# EAGLE board PCB Layout (EAGLE 9.7.0)
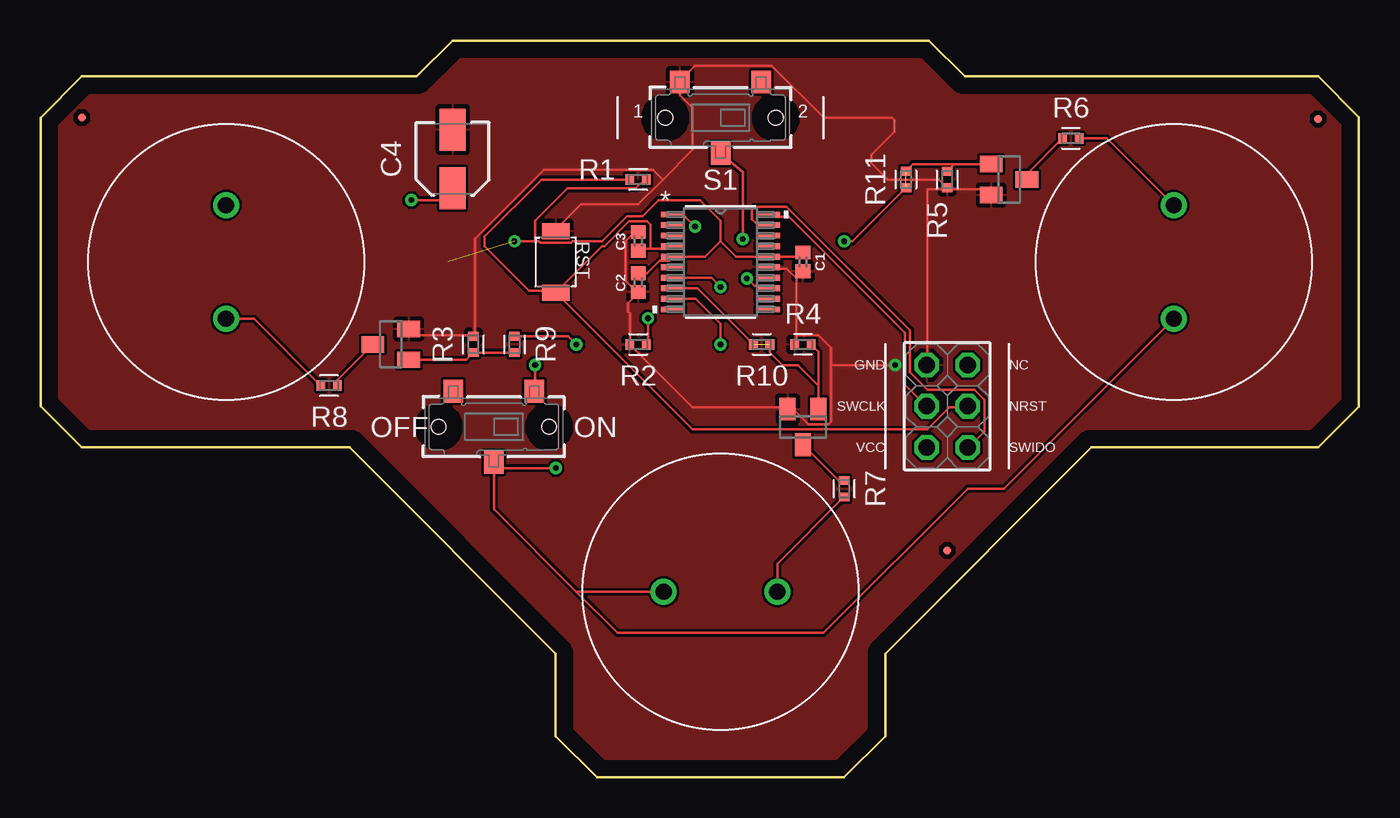
[diagram p0: board, top side]
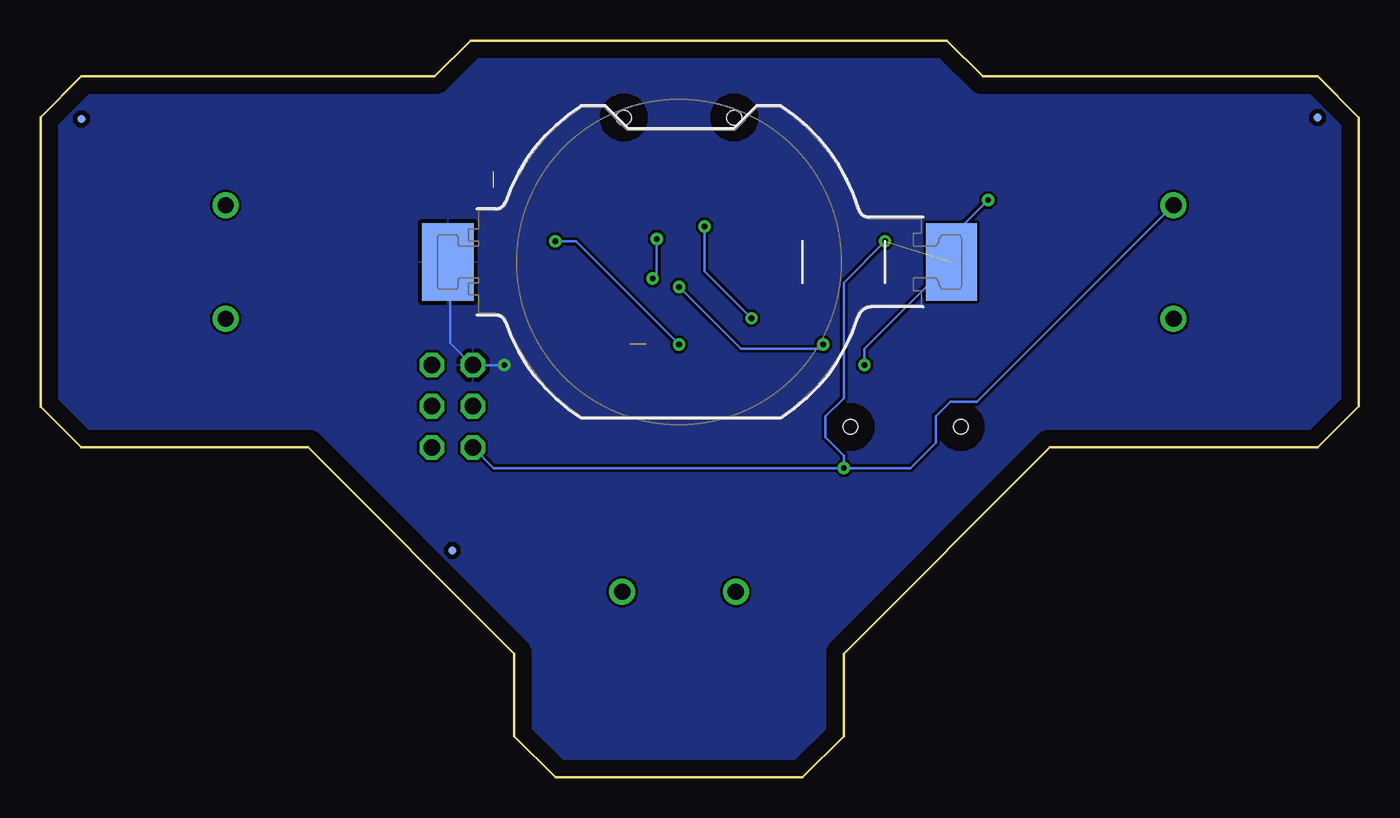
[diagram p1: board, bottom side, seen from below]

Size 81.26 x 45.39 mm. Coordinates in mm from the lower left corner, seen from the top.
Outline: 0,40.64 0,22.86 2.54,20.32 19.05,20.32 31.75,7.62 31.75,2.54 34.29,0 49.53,0 52.07,2.54 52.07,7.62 64.77,20.32 78.74,20.32 81.26,22.84 81.26,40.66 78.74,43.18 56.96,43.18 54.75,45.39 25.4,45.39 23.19,43.18 2.54,43.18 0,40.64
Copper layers (1*16): Top / Bottom
Stack-up Default Layer Stack: Top SilkScreen Epoxy Ink / Top SolderMask SR:Green 0.0254mm Dk 4.3 / Top Surface Finish Lead-Free 0.02mm / Top CuFoil:007 0.035mm / Dielectric-1 User Defined 1.5mm / Bottom CuFoil:007 0.035mm / Bottom Surface Finish Lead-Free 0.02mm / Bottom SolderMask SR:Green 0.0254mm Dk 4.3 / Bottom SilkScreen Epoxy Ink
Design rules: minimum drill size 0.35mm, minimum copper width 6mil, keepout clearance 0mil, drill distance 6mil, via restrict clearance 0mil, dimension clearance 40mil, restrict clearance 0mil, copper clearance wire_polygon to wire_polygon 6mil, copper clearance wire_polygon to pad_smd 6mil, copper clearance wire_polygon to via 6mil, copper clearance pad_smd to pad_smd 6mil, copper clearance pad_smd to via 6mil, copper clearance via to via 6mil, copper clearance smd to pad (same net) 6mil, copper clearance smd to via (same net) 6mil, copper clearance smd to smd (same net) 6mil

## Footprints (pad centres in the part's own frame; a part is rotated, then mirrored left to right if it is on the bottom)
796136-1 = smd 3.15 x 4.78: N 14.25,0; P -16.79,0
0402 = smd 0.85 x 0.9: 1 -0.58,0; 2 0.58,0
CAPAE430X430N = smd 2.6 x 1.6: 1 -1.8,0; 2 1.8,0
FID_020 = smd 0.508 x 0.508 bottom: FIDB 0,0 | smd 0.508 x 0.508: FIDT 0,0
2X03 = drill 1.016 octagon: 1 -2.54,1.27; 2 0,1.27; 3 2.54,1.27; 4 -2.54,-1.27; 5 0,-1.27; 6 2.54,-1.27
PIEZO = drill 1 pad 1.6: 1 -3.5,0; 2 3.5,0
SOT23 = smd 1 x 1.4: 1 -0.95,-1.1; 2 0.95,-1.1; 3 0,1.1
RESC1005X40 = smd 0.535 x 0.644: 1 -0.507,0; 2 0.507,0
CL-SB-12B-01T = smd 1.2 x 1.4: 1 -2.5,-2.2; 3 2.5,-2.2; C 0,2.2 | hole 0.9: -3.4,0; 3.4,0
SW2-2.6-3.0X2.5X1.2+0.4MM = smd 1 x 1.7: 1 -1.9,0; 2 1.9,0
TSSOP20 = smd 1.473 x 0.356: 1 -2.921,2.925; 2 -2.921,2.275; 3 -2.921,1.625; 4 -2.921,0.975; 5 -2.921,0.325; 6 -2.921,-0.325; 7 -2.921,-0.975; 8 -2.921,-1.625; 9 -2.921,-2.275; 10 -2.921,-2.925; 11 2.921,-2.925; 12 2.921,-2.275; 13 2.921,-1.625; 14 2.921,-0.975; 15 2.921,-0.325; 16 2.921,0.325; 17 2.921,0.975; 18 2.921,1.625; 19 2.921,2.275; 20 2.921,2.925

## Placement (x,y rotation side)
BT1  796136-  [796136-1]  41.91,31.75 180 bottom
C1  0.1uF  [0402]  46.99,31.75 270 top
C2  0.1uF  [0402]  36.83,30.48 270 top
C3  0.1uF  [0402]  36.83,33.02 90 top
C4  47uF  [CAPAE430X430N]  25.4,38.1 90 top
FD1  FID_20MIL  [FID_020]  2.54,40.64 0 top
FD2  FID_20MIL  [FID_020]  78.74,40.56 0 top
FD3  FID_20MIL  [FID_020]  55.88,13.97 0 top
JP1  PINHD-2X3  [2X03]  55.88,22.86 90 top
LS1  PIEZO  [PIEZO]  11.43,31.75 90 top
LS2  PIEZO  [PIEZO]  41.91,11.43 180 top
LS3  PIEZO  [PIEZO]  69.85,31.75 270 top
Q1  NMOSFET  [SOT23]  21.59,26.67 90 top
Q2  NMOSFET  [SOT23]  46.99,21.59 180 top
Q3  NMOSFET  [SOT23]  59.69,36.83 270 top
R1  10k  [RESC1005X40]  36.83,36.83 0 top
R2  10k  [RESC1005X40]  36.83,26.67 180 top
R3  100k  [RESC1005X40]  26.67,26.67 270 top
R4  100k  [RESC1005X40]  46.99,26.67 0 top
R5  100k  [RESC1005X40]  55.88,36.83 90 top
R6  150  [RESC1005X40]  63.5,39.37 180 top
R7  150  [RESC1005X40]  49.53,17.78 270 top
R8  150  [RESC1005X40]  17.78,24.13 0 top
R9  220  [RESC1005X40]  29.21,26.67 90 top
R10  220  [RESC1005X40]  44.45,26.67 180 top
R11  220  [RESC1005X40]  53.34,36.83 90 top
S1  SPDT_SWITCH_CL-SB-12B-01T  [CL-SB-12B-01T]  41.91,40.64 180 top
S2  SPDT_SWITCH_CL-SB-12B-01T  [CL-SB-12B-01T]  27.94,21.59 180 top
SW1  B3U-1000P-2P-SMD  [SW2-2.6-3.0X2.5X1.2+0.4MM]  31.75,31.75 270 top
U1  STM32L031F6P6TSSOP20  [TSSOP20]  41.91,31.75 0 top

## Library data of the parts
BT1 = Battery_Holder
C1-C3 = SparkFun-RF; PROD_ID: CAP-12416
C4 = Capacitor; CATEGORY_L1: Capacitor; CATEGORY_L2: Aluminum Electrolytic Capacitors; CATEGORY_L3: Radial can; DESCRIPTION: ECAP (Aluminum Electrolytic Capacitor), 0.157" Dia (4.00mm) body Size, 0.217" (5.50mm) Height - Seated (Max), 0.169" L x 0.169" W (4.30mm x 4.30mm) Surface Mount Land Size; PACKAGE: Surface Mount
FD1-FD3 = PCB_Utilities; CATEGORY_L1: Fiducial Marks; DESCRIPTION: Fiducial Mark 0.508mm (20mil); PACKAGE: Surface Mount
JP1 = Connector
LS1-LS3 = Tinkercad
Q1-Q3 = Tinkercad; CATEGORY: Transistor; SUB-CATEGORY: MOSFET; TYPE: N-Channel
R1-R11 = Resistor
S1 S2 = Switch
SW1 = Fidget_Spinner; MPN: B3U-1000P-2P-SMD
U1 = 2026-06-21_14-31-46_Library; COPYRIGHT: Copyright (C) 2026 Ultra Librarian. All rights reserved.; DATASHEET: https://www.st.com/resource/en/datasheet/stm32l031g4.pdf; DESCRIPTION: Ultra-low-power Arm Cortex-M0+ MCU with 32-Kbytes of Flash memory, 32 MHz CPU; MANUFACTURER_NAME: STMicroelectronics; MANUFACTURER_PART_NUMBER: STM32L031F6P6

## Nets
+: BT1.P C1.1 C2.1 C4.1 JP1.1 LS1.2 LS2.2 LS3.2 R1.2 S2.1 S2.C U1.5 U1.16
BUZZER1_OUT: R9.2 U1.7
BUZZER2_OUT: Q2.1 R4.2 R10.1 R10.2 U1.8
BUZZER3_OUT: Q3.1 R5.2 R11.1 R11.2 U1.9
GND: BT1.N C1.2 C2.2 C3.2 C4.2 JP1.3 Q1.2 Q2.2 Q3.2 R2.2 R3.1 R4.1 R5.1 S1.3 SW1.1 U1.15
N$1: R2.1 U1.1
N$2: Q1.3 R8.2
N$3: Q2.3 R7.1
N$4: Q3.3 R6.2
N$5: S1.C U1.13
N$6: LS3.1 R6.1
N$7: LS2.1 R7.2
N$8: LS1.1 R8.1
N$9: Q1.1 R3.2 R9.1
NRST: C3.1 JP1.5 R1.1 SW1.2 U1.4
SWCLK: JP1.2 U1.20
SWDIO: JP1.4 U1.19

## Tracks (layer width: path | path; a pad name or v marks a point on that pad's centre or on a via)
+  (via drill 0.35)  (1 unrouted)
  Top 0.152: v22.86,35.56 25.4,35.56 C4.1 | v30.48,25.4 30.48,23.83 S2.1 | v31.75,19.05 28.28,19.05 S2.C 27.94,16.51 33.02,11.43 | 33.02,11.43 LS2.2 | 33.02,11.43 35.56,8.89 48.26,8.89 57.15,17.78 59.38,17.78 LS3.2 | v29.21,33.02 30.48,33.02 | 30.48,33.02 30.48,34.29 32.47,36.28 36.69,36.28 37.23,36.83 R1.2 | 30.48,33.02 30.71,33.02 30.8,32.92 32.7,32.92 32.79,33.02 34.62,33.02 36.16,34.56 37.1,34.56 38.1,35.56 40.64,35.56 41.91,34.29 41.91,33.02 | 41.91,33.02 40.96,32.08 U1.5 38.74,31.83 38.16,31.83 37.39,31.06 C2.1 | 41.91,33.02 42.85,32.08 U1.16 46.73,32.08 C1.1
  Bottom 0.152: v22.86,35.56 25.12,33.3 BT1.P 30.48,26.39 v30.48,25.4 | v31.75,19.05 53.34,19.05 JP1.1 | v31.75,19.05 27.63,19.05 26.08,20.6 26.08,22.23 25.18,23.13 23.55,23.13 LS1.2 | v29.21,33.02 31.75,30.48 31.75,23.36 32.88,22.23 32.88,20.95 31.75,19.82 v31.75,19.05
BUZZER1_OUT  (via drill 0.35)
  Top 0.152: R9.2 32.51,27.18 v33.02,26.67 | U1.7 41.35,30.77 v41.91,30.21
  Bottom 0.152: v33.02,26.67 33.29,26.4 38.1,26.4 v41.91,30.21
BUZZER2_OUT  (1 unrouted)
  Top 0.152: Q2.1 47.94,24.13 | 47.94,24.13 47.94,26.23 R4.2 | 47.94,24.13 46.67,25.4 45.72,25.4 44.96,26.16 R10.1 | R10.2 40.49,30.12 U1.8
BUZZER3_OUT  (via drill 0.35)  (1 unrouted)
  Top 0.152: U1.9 40.38,29.47 41.91,27.94 v41.91,26.67 | Q3.1 56.32,37.78 | 56.32,37.78 53.78,37.78 R11.2 | R11.1 50.04,33.02 v49.53,33.02 | R5.2 56.32,37.78
  Bottom 0.152: v41.91,26.67 48.26,33.02 v49.53,33.02
GND  (via drill 0.35)
  Top 0.152: 36.83,29.82 36.07,30.58 36.07,33.02 36.52,33.48 36.83,33.48 C3.2 | 36.83,29.82 C2.2 | 46.58,30.73 46.58,27.23 | 46.58,27.23 46.58,26.77 R4.1 | 46.58,30.73 46.89,31.04 C1.2 | 48.72,25.4 48.72,26.47 47.95,27.23 46.58,27.23 | 48.72,25.4 48.72,21.89 48.56,21.74 47.35,21.74 46.43,22.66 46.13,22.66 Q2.2 45.97,22.81 40.18,22.81 36.37,26.62 R2.2 36.32,28.59 36.22,28.69 36.22,29.21 36.83,29.82 | 46.58,30.73 45.97,31.34 44.91,31.34 U1.15 | 55.98,36.22 54.66,36.22 54.66,25.4 JP1.3 | 55.98,36.22 58.17,36.22 58.47,35.92 Q3.2 | 55.98,36.22 R5.1 55.38,36.82 52.23,36.82 51.22,37.83 51.22,38.37 52.62,39.77 52.62,40.5 52.49,40.63 48.27,40.63 45.06,43.84 40.34,43.84 39.42,42.93 S1.3 39.42,42.77 39.42,42.01 40.18,41.25 40.18,38.66 38.35,36.83 | Q1.2 22.81,27.53 23.11,27.23 26.62,27.23 R3.1 26.77,27.23 26.77,33.17 31.04,37.44 37.74,37.44 38.35,36.83 | 38.35,36.83 36.83,35.31 33.33,35.31 31.8,33.78 SW1.1 | v52.68,25.4 48.72,25.4
  Bottom 0.152: BT1.N 56.03,31.65 56.03,26.77 54.66,25.4 JP1.3 v52.68,25.4
  pour Bottom: 0,40.64 0,22.86 2.54,20.32 19.05,20.32 31.75,7.62 31.75,2.54 34.29,0 49.53,0 52.07,2.54 52.07,7.62 64.77,20.32 78.74,20.32 81.26,22.84 81.26,40.66 78.74,43.18 56.96,43.18 54.75,45.39 25.4,45.39 23.19,43.18 2.54,43.18
  pour Top: 0,40.64 0,22.86 2.54,20.32 19.05,20.32 31.75,7.62 31.75,2.54 34.29,0 49.53,0 52.07,2.54 52.07,7.62 64.77,20.32 78.74,20.32 81.26,22.84 81.26,40.66 78.74,43.18 56.96,43.18 54.75,45.39 25.4,45.39 23.19,43.18 2.54,43.18
N$1  (via drill 0.35)
  Top 0.152: v40.34,33.93 39.73,34.54 39.12,34.54 U1.1 | R2.1 37.44,26.77 v37.44,28.28
  Bottom 0.152: v40.34,33.93 40.34,31.19 37.44,28.3 v37.44,28.28
N$2
  Top 0.152: Q1.3 18.29,24.47 R8.2
N$3
  Top 0.152: Q2.3 49.19,18.29 R7.1
N$4
  Top 0.152: Q3.3 60.79,37.17 R6.2
N$5  (via drill 0.35)
  Top 0.152: v43.28,33.17 43.28,37.28 S1.C | v43.54,30.73 43.99,30.28 44.76,30.28 U1.13
  Bottom 0.152: v43.28,33.17 43.28,30.99 v43.54,30.73
N$6
  Top 0.152: R6.1 65.73,39.37 LS3.1
N$7
  Top 0.152: R7.2 45.41,13.15 LS2.1
N$8
  Top 0.152: R8.1 13.15,28.25 LS1.1
N$9
  Top 0.152: Q1.1 26.23,25.72 R3.2 R9.1
NRST
  Top 0.152: 37.59,32.56 38.81,32.56 38.96,32.72 U1.4 | 37.59,32.56 36.83,32.56 C3.1 | R1.1 30.89,36.83 27.38,33.33 27.38,32.72 30.12,29.97 31.65,29.97 SW1.2 | JP1.5 57.1,22.81 56.03,22.81 54.66,21.44 40.18,21.44 31.8,29.82 SW1.2 | SW1.2 34.62,32.72 34.75,32.72 36.28,34.25 37.38,34.25 37.59,34.04 37.59,32.56
SWCLK
  Top 0.152: JP1.2 53.29,24.18 53.29,27.38 46.13,34.54 44.91,34.54 U1.20
SWDIO
  Top 0.152: U1.19 44.76,34.09 44.14,34.09 43.84,34.39 43.84,35 43.99,35.15 45.97,35.15 53.59,27.53 53.59,24.94 54.66,23.88 57.56,23.88 58.17,23.27 58.17,21.29 57.25,20.37 JP1.4

## Text on the board
NamesTop: 1 | 2 | RST | GND | NC | SWCLK | NRST | OFF | ON | VCC | SWIDO
ValuesTop: S2